# Altium PCB PCB1.pcbdoc (part 1 of 2)
Units mil, origin at the board's own origin, x right, y up, seen from the top; angles counter-clockwise.
Board outline 3937.01 x 2559.06 mil, 2 copper layers (Top Layer, Bottom Layer), stack 62.206 mil thick; 130 components, 96 nets, 456 pads, 345 vias.
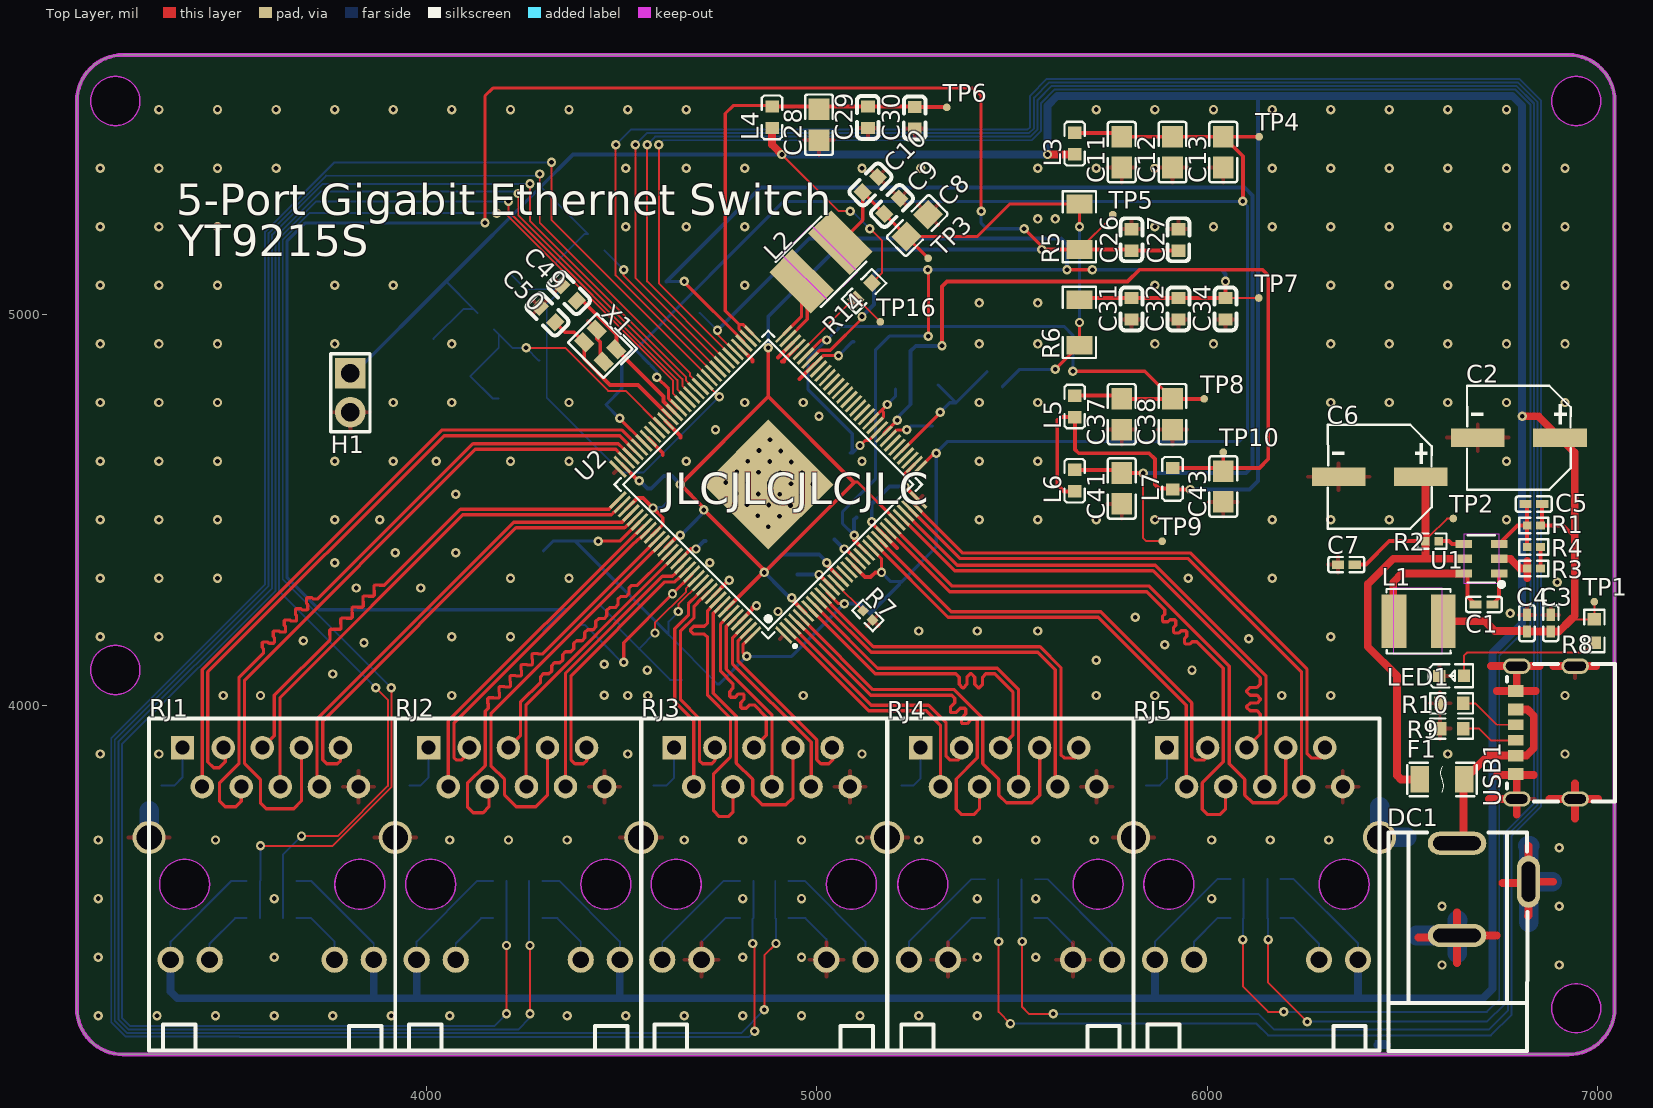
[diagram p0: Top Layer view]
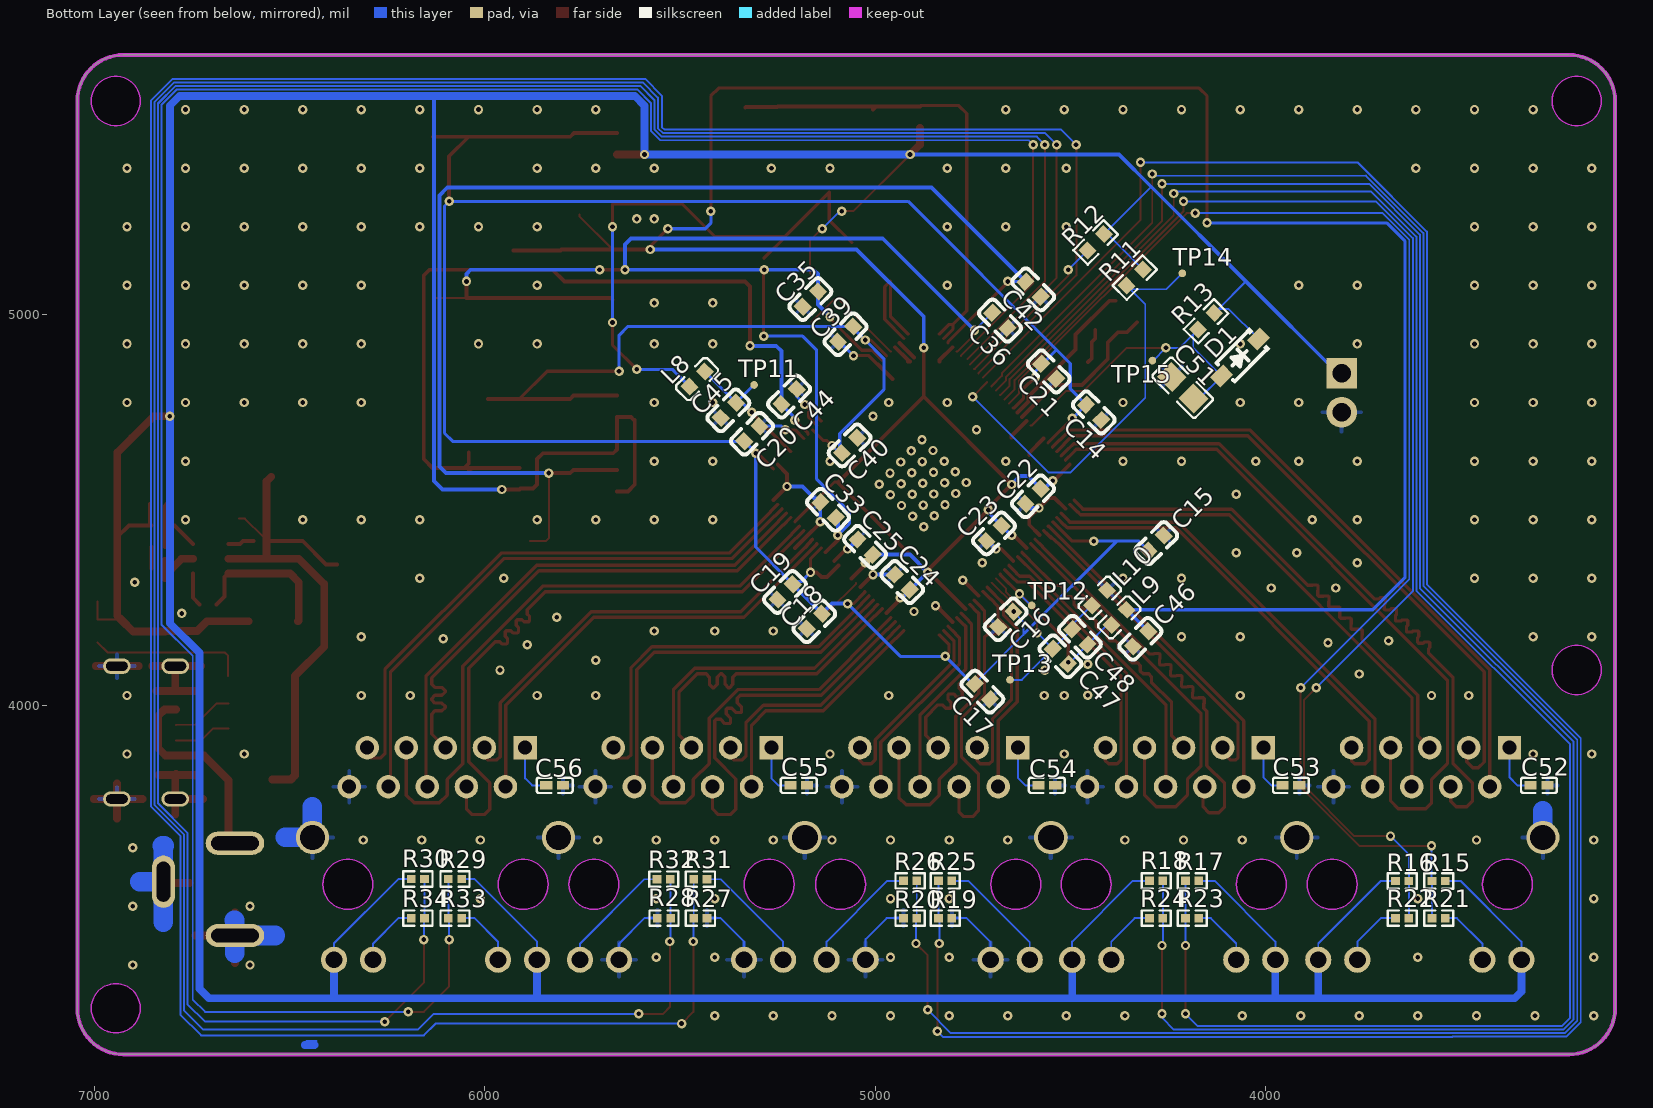
[diagram p1: Bottom Layer view, seen from below]

## Layer stack, top to bottom
Top Solder Mask Layer: solder mask 0.394, Dk 3.3
Top Layer: signal copper 1.379
Dielectric1: surface 59.449, FR4, Dk 4.5
Bottom Layer: signal copper 1.378
Bottom Solder Mask Layer: solder mask 0.394, Dk 3.3

## Board outline
3223.87,5665 ccw(c3223.87,5546.89) 3105.76,5546.89 3105.76,3224.06 ccw(c3223.87,3224.06) 3223.87,3105.94 6924.66,3105.94 ccw(c6924.66,3224.06) 7042.77,3224.06 7042.77,5546.89 ccw(c6924.66,5546.89) 6924.66,5665
cut-out: 3267.18,5546.89 cw(c3204.18,5546.89) 3141.19,5546.89 cw(c3204.18,5546.89)
cut-out: 7007.33,5546.89 cw(c6944.34,5546.89) 6881.35,5546.89 cw(c6944.34,5546.89)
cut-out: 7007.33,3224.06 cw(c6944.34,3224.06) 6881.35,3224.06 cw(c6944.34,3224.06)
cut-out: 3267.18,4090.2 cw(c3204.18,4090.2) 3141.19,4090.2 cw(c3204.18,4090.2)

## Design rules (kind name [scope] priority, off if disabled: settings)
BoardOutlineClearance copperThickness2oz_1 [All] p2 off: genericclearance=8 ignorepadtopadclearanceinfootprint=FALSE except(0: Arc-SplitContinuation Track-SplitContinuation SMDPad-SplitContinuation THPad-SplitContinuation Via-SplitContinuation Fill-SplitContinuation Region-SplitContinuation Poly-SplitContinuation Text-SplitContinuation Hole-SplitContinuation; 6: SMDPad-CutoutEdge THPad-CutoutEdge Via-CutoutEdge Fill-CutoutEdge Region-CutoutEdge Text-CutoutEdge Hole-CutoutEdge; 8: Poly-OutlineEdge Poly-CutoutEdge; 11.8: Arc-OutlineEdge Track-OutlineEdge SMDPad-OutlineEdge THPad-OutlineEdge Via-OutlineEdge Fill-OutlineEdge Region-OutlineEdge Text-OutlineEdge Hole-OutlineEdge Arc-CutoutEdge Track-CutoutEdge)
BoardOutlineClearance Plane_innerPlane_1 [All] p4 off: genericclearance=4 ignorepadtopadclearanceinfootprint=FALSE except(0: Arc-SplitContinuation Track-SplitContinuation SMDPad-SplitContinuation THPad-SplitContinuation Via-SplitContinuation Fill-SplitContinuation Region-SplitContinuation Poly-SplitContinuation Text-SplitContinuation Hole-SplitContinuation; 6: SMDPad-CutoutEdge THPad-CutoutEdge Via-CutoutEdge Fill-CutoutEdge Region-CutoutEdge Text-CutoutEdge Hole-CutoutEdge; 10: Poly-OutlineEdge Poly-CutoutEdge; 11.8: Arc-OutlineEdge Track-OutlineEdge SMDPad-OutlineEdge THPad-OutlineEdge Via-OutlineEdge Fill-OutlineEdge Region-OutlineEdge Text-OutlineEdge Hole-OutlineEdge Arc-CutoutEdge Track-CutoutEdge)
BoardOutlineClearance Copper_copperRegion_1 [All] p6 off: genericclearance=4 ignorepadtopadclearanceinfootprint=FALSE except(0: Arc-SplitContinuation Track-SplitContinuation SMDPad-SplitContinuation THPad-SplitContinuation Via-SplitContinuation Fill-SplitContinuation Region-SplitContinuation Poly-SplitContinuation Text-SplitContinuation Hole-SplitContinuation; 6: SMDPad-CutoutEdge THPad-CutoutEdge Via-CutoutEdge Fill-CutoutEdge Region-CutoutEdge Text-CutoutEdge Hole-CutoutEdge; 10: Poly-OutlineEdge Poly-CutoutEdge; 11.8: Arc-OutlineEdge Track-OutlineEdge SMDPad-OutlineEdge THPad-OutlineEdge Via-OutlineEdge Fill-OutlineEdge Region-OutlineEdge Text-OutlineEdge Hole-OutlineEdge Arc-CutoutEdge Track-CutoutEdge)
BoardOutlineClearance copperThickness1oz_1 [All] p8: genericclearance=4 ignorepadtopadclearanceinfootprint=FALSE except(0: Arc-SplitContinuation Track-SplitContinuation SMDPad-SplitContinuation THPad-SplitContinuation Via-SplitContinuation Fill-SplitContinuation Region-SplitContinuation Poly-SplitContinuation Text-SplitContinuation Hole-SplitContinuation; 6: SMDPad-CutoutEdge THPad-CutoutEdge Via-CutoutEdge Fill-CutoutEdge Region-CutoutEdge Text-CutoutEdge Hole-CutoutEdge; 8: Poly-OutlineEdge Poly-CutoutEdge; 11.8: Arc-OutlineEdge Track-OutlineEdge SMDPad-OutlineEdge THPad-OutlineEdge Via-OutlineEdge Fill-OutlineEdge Region-OutlineEdge Text-OutlineEdge Hole-OutlineEdge Arc-CutoutEdge Track-CutoutEdge)
Clearance copperThickness2oz [All] p1 off: gap=8 ignorepadtopadclearanceinfootprint=FALSE except(6: SMDPad-Track SMDPad-SMDPad THPad-Track SMDPad-THPad THPad-THPad Track-Via SMDPad-Via THPad-Via Via-Via Fill-Track Region-Track Fill-SMDPad Region-SMDPad Fill-THPad Region-THPad Fill-Via Region-Via Fill-Fill Fill-Region Region-Region Arc-Track Arc-SMDPad Arc-THPad Arc-Via Fill-Arc Region-Arc Arc-Arc Text-Track SMDPad-Text Text-THPad Text-Via Fill-Text Region-Text Arc-Text Text-Text Hole-Track Hole-SMDPad Hole-THPad Hole-Via Fill-Hole Region-Hole Hole-Arc Hole-Text)
Clearance Plane_innerPlane [All] p3 off: gap=4 ignorepadtopadclearanceinfootprint=FALSE except(6: SMDPad-Track SMDPad-SMDPad THPad-Track SMDPad-THPad THPad-THPad Track-Via SMDPad-Via THPad-Via Via-Via Fill-Track Region-Track Fill-SMDPad Region-SMDPad Fill-THPad Region-THPad Fill-Via Region-Via Fill-Fill Fill-Region Region-Region Arc-Track Arc-SMDPad Arc-THPad Arc-Via Fill-Arc Region-Arc Arc-Arc Text-Track SMDPad-Text Text-THPad Text-Via Fill-Text Region-Text Arc-Text Text-Text Hole-Track Hole-SMDPad Hole-THPad Hole-Via Fill-Hole Region-Hole Hole-Arc Hole-Text; 10: Poly-Track Poly-SMDPad Poly-THPad Poly-Via Poly-Fill Poly-Region Poly-Poly Poly-Arc Poly-Text Poly-Hole)
Clearance Copper_copperRegion [All] p5 off: gap=4 ignorepadtopadclearanceinfootprint=FALSE except(6: SMDPad-Track SMDPad-SMDPad THPad-Track SMDPad-THPad THPad-THPad Track-Via SMDPad-Via THPad-Via Via-Via Fill-Track Region-Track Fill-SMDPad Region-SMDPad Fill-THPad Region-THPad Fill-Via Region-Via Fill-Fill Fill-Region Region-Region Arc-Track Arc-SMDPad Arc-THPad Arc-Via Fill-Arc Region-Arc Arc-Arc Text-Track SMDPad-Text Text-THPad Text-Via Fill-Text Region-Text Arc-Text Text-Text Hole-Track Hole-SMDPad Hole-THPad Hole-Via Fill-Hole Region-Hole Hole-Arc Hole-Text; 8: Poly-Track Poly-SMDPad Poly-THPad Poly-Via Poly-Fill Poly-Region Poly-Poly Poly-Arc Poly-Text Poly-Hole)
Clearance copperThickness1oz [All] p7: gap=4 ignorepadtopadclearanceinfootprint=FALSE except(6: SMDPad-Track SMDPad-SMDPad THPad-Track SMDPad-THPad THPad-THPad Track-Via SMDPad-Via THPad-Via Via-Via Fill-Track Region-Track Fill-SMDPad Region-SMDPad Fill-THPad Region-THPad Fill-Via Region-Via Fill-Fill Fill-Region Region-Region Arc-Track Arc-SMDPad Arc-THPad Arc-Via Fill-Arc Region-Arc Arc-Arc Text-Track SMDPad-Text Text-THPad Text-Via Fill-Text Region-Text Arc-Text Text-Text Hole-Track Hole-SMDPad Hole-THPad Hole-Via Fill-Hole Region-Hole Hole-Arc Hole-Text; 8: Poly-Track Poly-SMDPad Poly-THPad Poly-Via Poly-Fill Poly-Region Poly-Poly Poly-Arc Poly-Text Poly-Hole)
DiffPairsRouting 100欧姆共面差分阻抗匹配 [(InNet('P3MDIA_P') OR InNet('P3MDIA_N') OR InNet('P3MDIB_P') OR InNet('P3MDIB_N') OR InNet('P3MDIC_P') OR InNet('P3MDIC_N') OR InNet('P3MDID_P') OR InNet('P3MDID_N') OR InNet('P4MDIA_P') OR InNet('P4MDIA_N') OR InNet('P4MDIB_P') OR InNet('P4MDIB_N') OR InNet('P4MDIC_P') OR InNet('P4MDIC_N') OR InNet('P4MDID_P') OR InNet('P4MDID_N') OR InNet('P0MDIA_P') OR InNet('P0MDIA_N') OR InNet('P0MDIB_P') OR InNet('P0MDIB_N') OR InNet('P0MDIC_P') OR InNet('P0MDIC_N') OR InNet('P0MDID_P') OR InNet('P0MDID_N') OR InNet('P1MDIA_P') OR InNet('P1MDIA_N') OR InNet('P1MDIB_P') OR InNet('P1MDIB_N') OR InNet('P1MDIC_P') OR InNet('P1MDIC_N') OR InNet('P1MDID_P') OR InNet('P1MDID_N') OR InNet('P2MDIA_P') OR InNet('P2MDIA_N') OR InNet('P2MDIB_P') OR InNet('P2MDIB_N') OR InNet('P2MDIC_P') OR InNet('P2MDIC_N') OR InNet('P2MDID_P') OR InNet('P2MDID_N'))] p1: maxlimit=6 minlimit=6 mostfreqgap=6 toplayer_minwidth=5 toplayer_prefwidth=8.4 toplayer_maxwidth=100 toplayer_mingap=6 toplayer_prefgap=6 toplayer_maxgap=6 bottomlayer_minwidth=5 bottomlayer_prefwidth=8.4 bottomlayer_maxwidth=100 bottomlayer_mingap=6 bottomlayer_prefgap=6 bottomlayer_maxgap=6 maxuncoupledlength=5
DiffPairsRouting differentialPair [All] p2: maxlimit=6 minlimit=6 mostfreqgap=6 toplayer_minwidth=5 toplayer_prefwidth=10 toplayer_maxwidth=100 toplayer_mingap=6 toplayer_prefgap=6 toplayer_maxgap=6 bottomlayer_minwidth=5 bottomlayer_prefwidth=10 bottomlayer_maxwidth=100 bottomlayer_mingap=6 bottomlayer_prefgap=6 bottomlayer_maxgap=6 maxuncoupledlength=10
HoleToHoleClearance otherClearance [All] p1: gap=11.8 allowstackedmicrovias=TRUE
Length netLength [All] p1: minlimit=0 maxlimit=0
PasteMaskExpansion pasteMaskExpansion [All] p1: expansion=0
PlaneConnect innerPlane [All] p1: planeconnectstyle=Relief reliefexpansion=20 reliefentries=4 reliefconductorwidth=10 reliefairgap=10
PolygonConnect copperRegion [All] p1: connectstyle=Relief reliefconductorwidth=10 reliefentries=4 polygonreliefangle="90 Angle" airgapwidth=10 via.connectstyle=Relief via.reliefconductorwidth=10 via.reliefentries=4 via.polygonreliefangle="90 Angle" via.airgapwidth=10
RoutingVias viaSize [All] p1: holewidth=12 width=24 viastyle="Through Hole" minholewidth=11.8 minwidth=19.7 maxholewidth=248 maxwidth=393.7
SolderMaskExpansion solderMaskExpansion [IsVia] p1: expansion=-1000 istentingtop=TRUE
SolderMaskExpansion solderMaskExpansion [All] p2: expansion=2 istentingtop=FALSE
Width copperThickness2oz_2 [All] p1 off: maxlimit=100 minlimit=8 preferedwidth=10
Width copperThickness1oz_2 [All] p2: maxlimit=100 minlimit=5 preferedwidth=10

## Components (designator, comment, footprint, x,y, rotation, side; value= is the part's Value field where it differs from the comment)
C1 "22nF" C0402 6708.1,4257.91 r180 top
C2 "220uF" CAP-SMD_BD6.3-L6.6-W6.6-LS7.4-FD 6797.46,4685 r180 top
C3 "100nF" C0402 6879.19,4210 r270 top
C4 "10nF" C0402 6818.21,4210 r270 top
C5 "22pF" C0402 6835.76,4515 r180 top
C6 "220uF" CAP-SMD_BD6.3-L6.6-W6.6-LS7.4-FD 6441.28,4585 r180 top
C7 "100nF" C0402 6355.76,4360 r0 top
C8 "10uF" C0805 5257.23,5228.1 r225 top
C9 "10nF" C0603 5192.23,5278.1 r225 top
C10 "100nF" C0603 5137.23,5333.1 r225 top
C11 "10uF" C0805 5780.76,5416.08 r90 top
C12 "10uF" C0805 5910.76,5416.08 r90 top
C13 "10uF" C0805 6040.76,5416.08 r90 top
C14 "10nF" C0603 4440.76,4750 r45 bottom
C15 "10nF" C0603 4280.76,4415 r315 bottom
C16 "10nF" C0603 4665.76,4220 r135 bottom
C17 "10nF" C0603 4725.76,4035 r45 bottom
C18 "10nF" C0603 5155.76,4215 r135 bottom
C19 "10nF" C0603 5230.76,4290 r135 bottom
C20 "10nF" C0603 5315.76,4695 r315 bottom
C21 "10nF" C0603 4555.76,4855 r45 bottom
C22 "10nF" C0603 4595.76,4535 r135 bottom
C23 "10nF" C0603 4695.76,4440 r135 bottom
C24 "10nF" C0603 4930.76,4315 r225 bottom
C25 "10nF" C0603 5025.76,4405 r225 bottom
C26 "10nF" C0603 5805.76,5191.35 r270 top
C27 "10nF" C0603 5925.76,5191.35 r270 top
C28 "10uF" C0805 5005.76,5486.08 r90 top
C29 "1uF" C0603 5130.76,5505.43 r90 top
C30 "10nF" C0603 5250.76,5504.21 r90 top
C31 "10nF" C0603 5805.97,5015 r90 top
C32 "10nF" C0603 5925.97,5015 r90 top
C33 "10nF" C0603 5120.76,4500 r225 bottom
C34 "10nF" C0603 6046.38,5015 r90 top
C35 "10nF" C0603 5165.76,5040 r135 bottom
C36 "10nF" C0603 4680.76,4985 r45 bottom
C37 "10uF" C0805 5780.76,4745 r90 top
C38 "10uF" C0805 5910.76,4745 r90 top
C39 "10nF" C0603 5075.76,4950 r135 bottom
C40 "10nF" C0603 5065.76,4665 r315 bottom
C41 "10uF" C0805 5780.76,4555 r90 top
C42 "10nF" C0603 4595.76,5065 r45 bottom
C43 "10uF" C0805 6040.76,4560 r90 top
C44 "10nF" C0603 5220.76,4790 r315 bottom
C45 "10nF" C0603 5375.76,4755 r135 bottom
C46 "100nF" C0603 4320.76,4170 r135 bottom
C47 "1uF" C0603 4525.76,4125 r225 bottom
C48 "1nF" C0603 4475.76,4175 r225 bottom
C49 "4pF" C0603 4365.76,5055 r315 top
C50 "4pF" C0603 4310.76,5000 r315 top
C51 "10uF" C0805 4213,4812.87 r225 bottom
C52 "100nF" C0402 3300.76,3795 r0 bottom
C53 "100nF" C0402 3935.76,3795 r0 bottom
C54 "100nF" C0402 4560.76,3795 r0 bottom
C55 "100nF" C0402 5195.76,3795 r0 bottom
C56 "100nF" C0402 5820.76,3795 r0 bottom
D1 "1N4148WQ" SOD-123_L2.7-W1.6-LS3.7-RD-1 4065.76,4890 r315 bottom
DC1 "DC-005-20A" DC-IN-TH_DC-005-20A 6730.76,3528.6 r90 top
F1 "BSMD1206-075-30V" F1206 6600.76,3810 r180 top
H1 "PZ254V-11-02P" HDR-TH_2P-P2.54-V-M 3805.76,4800 r270 top
L1 "4.7uH" IND-SMD_L4.0-W4.0 6540.74,4215 r0 top
L2 "2.2uH" IND-SMD_L4.0-W4.0_SWPA4018S 5010.76,5135 r225 top
L3 "BLM18KG221SN1D" L0603 5660.76,5437.85 r90 top
L4 "BLM18KG221SN1D" L0603 4885.76,5505.39 r90 top
L5 "BLM18KG221SN1D" L0603 5660.76,4765 r90 top
L6 "BLM18KG221SN1D" L0603 5660.76,4575 r90 top
L7 "BLM18KG221SN1D" L0603 5911.12,4580 r90 top
L8 "BLM18KG221SN1D" L0603 5455.76,4835 r135 bottom
L9 "BLM18KG221SN1D" L0603 4375.76,4225 r315 bottom
L10 "BLM18KG221SN1D" L0603 4425.76,4275 r315 bottom
LED1 "NCD0603W1" LED0603-RD 6625.38,4075 r0 top
R1 "18kΩ" R0402 6835.76,4460 r180 top
R2 "10kΩ" R0402 6575.12,4420 r0 top
R3 "2kΩ" R0402 6835.76,4350 r180 top
R4 "2kΩ" R0402 6835.76,4405 r0 top
R5 "0Ω" R1206 5672.58,5225 r270 top
R6 "0Ω" R1206 5672.58,4980 r90 top
R7 "2.49kΩ" R0402 5130.76,4230 r135 top
R8 "150Ω" R0603 6990.76,4190 r270 top
R9 "5.1kΩ" R0603 6625.55,3940 r180 top
R10 "5.1kΩ" R0603 6625.55,4005 r0 top
R11 "4.7kΩ" R0603 4335.76,5095 r135 bottom
R12 "4.7kΩ" R0603 4435.76,5185 r135 bottom
R13 "4.7kΩ" R0603 4153,4982.87 r135 bottom
R14 "4.7kΩ" R0603 5120.76,5060 r45 top
R15 "4.7kΩ" R0402 3557.56,3550 r180 bottom
R16 "4.7kΩ" R0402 3650.76,3550 r0 bottom
R17 "4.7kΩ" R0402 4188.48,3550.52 r180 bottom
R18 "4.7kΩ" R0402 4280.76,3550.52 r0 bottom
R19 "4.7kΩ" R0402 4820.76,3455 r180 bottom
R20 "4.7kΩ" R0402 4910.76,3455 r0 bottom
R21 "470Ω" R0402 3557.56,3455 r180 bottom
R22 "470Ω" R0402 3650.76,3455 r180 bottom
R23 "470Ω" R0402 4188.48,3455 r180 bottom
R24 "470Ω" R0402 4280.76,3455 r180 bottom
R25 "470Ω" R0402 4820.76,3550.52 r180 bottom
R26 "470Ω" R0402 4910.76,3550.52 r180 bottom
R27 "4.7kΩ" R0402 5447.56,3455 r180 bottom
R28 "4.7kΩ" R0402 5540.76,3455 r0 bottom
R29 "4.7kΩ" R0402 6075.76,3555 r180 bottom
R30 "4.7kΩ" R0402 6170.76,3555 r0 bottom
R31 "470Ω" R0402 5447.56,3554.51 r180 bottom
R32 "470Ω" R0402 5541.46,3554.51 r180 bottom
R33 "470Ω" R0402 6075.76,3455 r180 bottom
R34 "470Ω" R0402 6170.76,3455 r180 bottom
RJ1 "HR911130A" RJ45-TH_HR911130A 3605.76,3620 r180 top
RJ2 "HR911130A" RJ45-TH_HR911130A 4235.76,3620 r180 top
RJ3 "HR911130A" RJ45-TH_HR911130A 4864.41,3620 r180 top
RJ4 "HR911130A" RJ45-TH_HR911130A 5495.76,3620 r180 top
RJ5 "HR911130A" RJ45-TH_HR911130A 6125.76,3620 r180 top
TP1 "" Test-Point-0.5mm 6990.76,4265 r0 top
TP2 "" Test-Point-0.5mm 6629.49,4478.02 r0 top
TP3 "" Test-Point-0.5mm 5285.07,5144.26 r0 top
TP4 "" Test-Point-0.5mm 6132.64,5455.45 r0 top
TP5 "" Test-Point-0.5mm 5757.65,5255.94 r0 top
TP6 "" Test-Point-0.5mm 5332.74,5530.59 r0 top
TP7 "" Test-Point-0.5mm 6131.51,5042.56 r0 top
TP8 "" Test-Point-0.5mm 5991.82,4784.37 r0 top
TP9 "" Test-Point-0.5mm 5884.27,4419.96 r0 top
TP10 "" Test-Point-0.5mm 6040.76,4647.56 r0 top
TP11 "" test-point-0.5mm 5310.09,4819.96 r180 bottom
TP12 "" Test-Point-0.5mm 4599.41,4255.52 r180 bottom
TP13 "" Test-Point-0.5mm 4654.94,4065 r180 bottom
TP14 "" Test-Point-0.5mm 4213.73,5105.71 r180 bottom
TP15 "" Test-Point-0.5mm 4290.4,4882.36 r225 bottom
TP16 "" Test-Point-0.5mm 5162.72,4981.53 r0 top
U1 "MT2492" SOT-23-6_L2.9-W1.6-P0.95-LS2.8-BL 6701.57,4375 r90 top
U2 "RTL8367S-CG" LQFP-128_L14.0-W14.0-P0.40-LS16.0-BL 4875.76,4565 r45 top
USB1 "TYPE-C 6P(040新)" USB-C-SMD_TYPE-C-6P 6865.76,3930 r90 top
X1 "-" CRYSTAL-SMD_4P-L2.0-W1.6-BL 4445.76,4920 r135 top

## Footprints (in the part's own frame and the unit in brackets; to place one, negate y for a bottom-side part, rotate by r counter-clockwise, add the part's x,y. Pads: shape width x height; smd on the part's side, far side on the other; paste and mask are expansions set on the pad)
C0402 [mm]
  rect 0.79x0.54 smd paste-100 mask+0.051: 1(-0.545,0) 2(0.545,0)
  silkscreen extent -1.17,-0.5 1.17,0.5
C0603 [mm]
  rect 0.8x0.9 smd: 1(-0.7,0) 2(0.7,0)
  silkscreen extent -1.41,-0.71 1.39,0.72
C0805 [mm]
  rect 1.41x1.35 smd paste-100 mask+0.051: 1(-1,0) 2(1,0)
  silkscreen extent -1.96,-0.9 1.96,0.9
CAP-SMD_BD6.3-L6.6-W6.6-LS7.4-FD [mm]
  rect 3.5x1.2 smd: 1(-2.67,0) 2(2.67,0)
  silkscreen extent -3.38,-3.38 3.38,3.38
CRYSTAL-SMD_4P-L2.0-W1.6-BL [mm]
  rect 1.1x0.8 smd: 1(-0.9,-0.575) 2(0.9,-0.575) 3(0.9,0.575) 4(-0.9,0.575)
  silkscreen extent -1.82,-1.56 1.64,1.33
DC-IN-TH_DC-005-20A [mm]
  oval 1.5x3.8 hole 0.9 slot 3.1 at 90 deg copper offset -0.001,0: 1(3.001,2.325)
  oval 1.5x3.8 hole 0.9 slot 3.1 at 90 deg copper offset 0,0: 2(-3.001,2.325)
  oval 3.4x1.5 hole 0.9 slot 2.6 at 0 deg copper offset -0.001,0: 3(0.501,-2.325)
  silkscreen extent -10.51,-2.24 3.71,6.78
F1206 [mm]
  rect 1.19x1.728 smd: 1(-1.445,0) 2(1.445,0)
  silkscreen extent -2.27,-1.09 2.27,1.09
HDR-TH_2P-P2.54-V-M [mm]
  rect 2x2 hole 1.2: 1(-1.27,0)
  round 2 hole 1.2: 2(1.27,0)
  silkscreen extent -2.54,-1.27 2.54,1.27
IND-SMD_L4.0-W4.0 [mm]
  rect 1.6x3.5 smd: 1(-1.6,0) 2(1.6,0)
  silkscreen extent -2.08,-2.1 2.08,2.1
IND-SMD_L4.0-W4.0_SWPA4018S [mil]
  rect 83.62x150.39 smd: 1(70,0) 2(-70,0)
  silkscreen extent -82,-82 82,82
L0603 [mm]
  rect 0.8x0.864 smd paste-100 mask+0.051: 1(-0.7,0) 2(0.7,0)
  silkscreen extent -1.42,-0.65 1.41,0.67
LED0603-RD [mm]
  rect 0.8x0.8 smd: 1(-0.799,-0.003) 2(0.799,0.003)
  silkscreen extent -1.49,-0.75 1.39,0.76
LQFP-128_L14.0-W14.0-P0.40-LS16.0-BL [mm]
  rect 0.2x1.46 smd: 1(-6.2,-7.63) 2(-5.8,-7.63) 3(-5.4,-7.63) 4(-5,-7.63) 5(-4.6,-7.63) 6(-4.2,-7.63) 7(-3.8,-7.63) 8(-3.4,-7.63) 9(-3,-7.63) 10(-2.6,-7.63) 11(-2.2,-7.63) 12(-1.8,-7.63) 13(-1.4,-7.63) 14(-1,-7.63) 15(-0.6,-7.63) 16(-0.2,-7.63) 17(0.2,-7.63) 18(0.6,-7.63) 19(1,-7.63) 20(1.4,-7.63) 21(1.8,-7.63) 22(2.2,-7.63) 23(2.6,-7.63) 24(3,-7.63) 25(3.4,-7.63) 26(3.8,-7.63) 27(4.2,-7.63) 28(4.6,-7.63) 29(5,-7.63) 30(5.4,-7.63) 31(5.8,-7.63) 32(6.2,-7.63) 65(6.2,7.63) 66(5.8,7.63) 67(5.4,7.63) 68(5,7.63) 69(4.6,7.63) 70(4.2,7.63) 71(3.8,7.63) 72(3.4,7.63) 73(3,7.63) 74(2.6,7.63) 75(2.2,7.63) 76(1.8,7.63) 77(1.4,7.63) 78(1,7.63) 79(0.6,7.63) 80(0.2,7.63) 81(-0.2,7.63) 82(-0.6,7.63) 83(-1,7.63) 84(-1.4,7.63) 85(-1.8,7.63) 86(-2.2,7.63) 87(-2.6,7.63) 88(-3,7.63) 89(-3.4,7.63) 90(-3.8,7.63) 91(-4.2,7.63) 92(-4.6,7.63) 93(-5,7.63) 94(-5.4,7.63) 95(-5.8,7.63) 96(-6.2,7.63)
  rect 1.46x0.2 smd: 33(7.63,-6.2) 34(7.63,-5.8) 35(7.63,-5.4) 36(7.63,-5) 37(7.63,-4.6) 38(7.63,-4.2) 39(7.63,-3.8) 40(7.63,-3.4) 41(7.63,-3) 42(7.63,-2.6) 43(7.63,-2.2) 44(7.63,-1.8) 45(7.63,-1.4) 46(7.63,-1) 47(7.63,-0.6) 48(7.63,-0.2) 49(7.63,0.2) 50(7.63,0.6) 51(7.63,1) 52(7.63,1.4) 53(7.63,1.8) 54(7.63,2.2) 55(7.63,2.6) 56(7.63,3) 57(7.63,3.4) 58(7.63,3.8) 59(7.63,4.2) 60(7.63,4.6) 61(7.63,5) 62(7.63,5.4) 63(7.63,5.8) 64(7.63,6.2) 97(-7.63,6.2) 98(-7.63,5.8) 99(-7.63,5.4) 100(-7.63,5) 101(-7.63,4.6) 102(-7.63,4.2) 103(-7.63,3.8) 104(-7.63,3.4) 105(-7.63,3) 106(-7.63,2.6) 107(-7.63,2.2) 108(-7.63,1.8) 109(-7.63,1.4) 110(-7.63,1) 111(-7.63,0.6) 112(-7.63,0.2) 113(-7.63,-0.2) 114(-7.63,-0.6) 115(-7.63,-1) 116(-7.63,-1.4) 117(-7.63,-1.8) 118(-7.63,-2.2) 119(-7.63,-2.6) 120(-7.63,-3) 121(-7.63,-3.4) 122(-7.63,-3.8) 123(-7.63,-4.2) 124(-7.63,-4.6) 125(-7.63,-5) 126(-7.63,-5.4) 127(-7.63,-5.8) 128(-7.63,-6.2)
  silkscreen extent -7.08,-8.76 7.08,7.08
R0402 [mm]
  rect 0.566x0.54 smd paste-100 mask+0.051: 1(-0.433,0) 2(0.433,0)
  silkscreen extent -0.94,-0.5 0.94,0.5
R0603 [mil]
  rect 31.75x34.02 smd paste-3937.01 mask+2: 1(-29.66,0) 2(29.66,0)
  silkscreen extent -55,-26 55,26
R1206 [mil]
  rect 47.54x66.97 smd paste-3937.01 mask+2: 1(-58.22,0) 2(58.22,0)
  silkscreen extent -91,-42 91,42
RJ45-TH_HR911130A [mil]
  round 66.93 hole 43.31: 11(260,271.58) 12(160,271.58) 13(-160,271.58) 14(-260,271.58)
  rect 60x60 hole 35.83: P1(229.63,-271.58)
  round 60 hole 35.83: P2(179.1,-171.34) P3(125.2,-271.34) P4(79.1,-171.34) P5(25.2,-271.34) P6(-20.9,-171.34) P7(-74.8,-271.34) P8(-120.9,-171.34) P9(-174.8,-271.34) P10(-220.9,-171.34)
  round 85 hole 65: SHIELD0(-315,-41.44) SHIELD1(315,-41.44)
  Board Outline Layer circle w0.1: c-224.4,78.66 r63.98
  Board Outline Layer circle w0.1: c224.4,78.66 r63.98
  Board Outline Layer region: -288.38,78.66 -282.04,106.42 -264.29,128.68 -238.64,141.04 -210.16,141.04 -184.51,128.68 -166.76,106.42 -160.42,78.66 -160.42,78.66 -166.76,50.91 -184.51,28.65 -210.16,16.29 -238.64,16.29 -264.29,28.65 -282.04,50.91 -288.38,78.66
  Board Outline Layer region: -288.38,78.66 -288,85.58 -286.88,92.42 -285.03,99.09 -282.46,105.53 -279.22,111.65 -275.33,117.38 -270.85,122.66 -265.82,127.42 -260.3,131.62 -254.37,135.19 -248.08,138.1 -241.52,140.31 -234.75,141.8 -227.86,142.55 -220.94,142.55 -214.05,141.8 -207.28,140.31 -200.72,138.1 -194.43,135.19 -188.5,131.62 -182.98,127.42 -177.95,122.66 -173.47,117.38 -169.58,111.65 -166.34,105.53 -163.77,99.09 -161.92,92.42 -160.8,85.58 -160.42,78.66 -160.8,71.75 -161.92,64.91 -163.77,58.24 -166.34,51.8 -169.58,45.68 -173.47,39.95 -177.95,34.67 -182.98,29.9 -188.5,25.71 -194.43,22.14 -200.72,19.23 -207.28,17.02 -214.05,15.53 -220.94,14.78 -227.86,14.78 -234.75,15.53 -241.52,17.02 -248.08,19.23 -254.37,22.14 -260.3,25.71 -265.82,29.9 -270.85,34.67 -275.33,39.95 -279.22,45.68 -282.46,51.8 -285.03,58.24 -286.88,64.91 -288,71.75
  Board Outline Layer region: 160.42,78.66 166.76,106.42 184.51,128.68 210.16,141.04 238.64,141.04 264.29,128.68 282.04,106.42 288.38,78.66 288.38,78.66 282.04,50.91 264.29,28.65 238.64,16.29 210.16,16.29 184.51,28.65 166.76,50.91 160.42,78.66
  Board Outline Layer region: 160.42,78.66 160.8,85.58 161.92,92.42 163.77,99.09 166.34,105.53 169.58,111.65 173.47,117.38 177.95,122.66 182.98,127.42 188.5,131.62 194.43,135.19 200.72,138.1 207.28,140.31 214.05,141.8 220.94,142.55 227.86,142.55 234.75,141.8 241.52,140.31 248.08,138.1 254.37,135.19 260.3,131.62 265.82,127.42 270.85,122.66 275.33,117.38 279.22,111.65 282.46,105.53 285.03,99.09 286.88,92.42 288,85.58 288.38,78.66 288,71.75 286.88,64.91 285.03,58.24 282.46,51.8 279.22,45.68 275.33,39.95 270.85,34.67 265.82,29.9 260.3,25.71 254.37,22.14 248.08,19.23 241.52,17.02 234.75,15.53 227.86,14.78 220.94,14.78 214.05,15.53 207.28,17.02 200.72,19.23 194.43,22.14 188.5,25.71 182.98,29.9 177.95,34.67 173.47,39.95 169.58,45.68 166.34,51.8 163.77,58.24 161.92,64.91 160.8,71.75
  Multi-Layer board cut-out: -288.38,78.66 -282.04,106.42 -264.29,128.68 -238.64,141.04 -210.16,141.04 -184.51,128.68 -166.76,106.42 -160.42,78.66 -160.42,78.66 -166.76,50.91 -184.51,28.65 -210.16,16.29 -238.64,16.29 -264.29,28.65 -282.04,50.91 -288.38,78.66
  Multi-Layer board cut-out: 160.42,78.66 166.76,106.42 184.51,128.68 210.16,141.04 238.64,141.04 264.29,128.68 282.04,106.42 288.38,78.66 288.38,78.66 282.04,50.91 264.29,28.65 238.64,16.29 210.16,16.29 184.51,28.65 166.76,50.91 160.42,78.66
  silkscreen extent -315,-346 315,504
SOD-123_L2.7-W1.6-LS3.7-RD-1 [mm]
  rect 1.2x0.95 smd: 1(-1.7,0) 2(1.7,0)
  silkscreen extent -1.81,-0.98 1.35,0.98
SOT-23-6_L2.9-W1.6-P0.95-LS2.8-BL [mil]
  rect 20.95x42.2 smd: 1(-37.4,-45.24) 2(0,-45.24) 3(37.4,-45.24) 4(37.4,45.24) 5(0,45.24) 6(-37.4,45.24)
  silkscreen extent -72,-57 61,35
Test-Point-0.5mm [mm]
  round 0.5 smd: 1(0,0)
test-point-0.5mm [mm]
  round 0.5 smd: 1(0,0)
USB-C-SMD_TYPE-C-6P [mm]
  oval 1x1.8 hole 0.6 slot 1.4 at 90 deg paste+0 mask+0.05: 1(-4.32,-1.925) 1(-4.32,1.875) 2(4.32,-1.925) 2(4.32,1.875)
  rect 0.7x1 smd paste-100 mask+0.05: A5(-0.499,1.925) B5(0.501,1.925)
  rect 0.75x1 smd paste-100 mask+0.05: A9(1.501,1.925) B9(-1.499,1.925)
  rect 0.8x1 smd paste-100 mask+0.05: A12(2.701,1.925) B12(-2.699,1.925)
  silkscreen extent -4.47,-4.52 4.47,2.5

## Free pads (board coordinates)
  rect 236.22x236.22 smd rot 45: 129(4876.24,4565)

## Via types
v1: diameter 24, hole 12, Top Layer to Bottom Layer, 190 vias
v2: diameter 24.02, hole 12, Top Layer to Bottom Layer, 155 vias

## Nets (pads, with @x,y where several pads share a name; then routed paths per layer and width w, separated by ;. In a path a pad name is that pad's centre, name@x,y a point inside that pad or via, vN(x,y) a via of type N, cw(c..) or ccw(c..) an arc to the next point about the centre after c; other vN are vias at no path point)
3V3: C2.1 C3.2 C4.2 C5.1 D1.1 H1.1 L1.2 L3.1 L4.1 L5.1 L6.1 L7.1 R1.1 R8.1 R11.2 R12.2 R13.2 R14.2 R15.2 R16.2 R17.2 R18.2 R29.2 R30.2 RJ1.11 RJ1.14 RJ2.11 RJ2.14 RJ5.11 RJ5.14 TP1.1 | length 15773.8
  Top Layer w5: v2(4910.76,5410) 5055.76,5265 v2(5085.76,5265) ; v2(5135.76,5220) 5136.73,5220 5167.48,5189.25 5167.48,5106.72 R14.2@5141.73,5080.97 ; 6930.94,4219.66 R8.1@6990.76,4219.66 TP1.1@6990.76,4265
  Top Layer w10: L6.1@5660.76,4547.44 5633.31,4547.44 5615.76,4565 5615.76,4730 5618.31,4730 5625.76,4737.44 L5.1@5660.76,4737.44 5660.76,4655 5670.76,4645 5850.76,4645 5865.76,4630 5865.76,4565 5875.76,4555 5908.57,4555 L7.1@5911.12,4552.44 v2(5955.76,4552.44) ; C5.1@6857.22,4515 6857.22,4464.42 R1.1@6852.8,4460 6910.76,4460 6940.76,4430
  Top Layer w20: L4.1@4885.76,5477.84 4885.76,5435 v2(4910.76,5410) ; v2(5590.76,5410) 5660.46,5410 L3.1@5660.76,5410.29 ; L1.2@6603.73,4215 6710.76,4215 6735.76,4190 6816.75,4190 C4.2@6818.21,4188.54 C3.2@6879.19,4188.54 6899.82,4188.54 6930.94,4219.66 6940.76,4229.48 6940.76,4430 6940.76,4646.77 C2.1@6902.57,4685 6847.53,4740 v2(6805.76,4740)
  Bottom Layer w5: RJ1.11@3345.76,3348.42 3345.76,3395.04 3500.72,3550 R15.2@3540.52,3550 ; R16.2@3667.8,3550 3705.76,3550 3865.76,3390 RJ1.14@3865.76,3348.42 ; RJ2.11@3975.76,3348.42 3975.76,3395 4131.28,3550.52 R17.2@4171.44,3550.52 ; D1.1@4018.43,4937.33 4018.43,4937.67 4095.76,5015 R13.2@4120.87,5015 ; 4049.32,5083.56 4052.31,5083.56 R13.2@4120.87,5015 ; R13.2@4132.02,5003.84 R13.2@4120.87,5015 ; 4293.26,5327.5 R12.2@4414.79,5205.97 4404.79,5205.97 R11.2@4314.79,5115.97 ; R18.2@4297.8,3550.52 4340.28,3550.52 4495.76,3395.04 RJ2.14@4495.76,3348.42 ; v2(5085.76,5265) 5090.76,5265 v2(5135.76,5220) ; RJ5.11@5865.76,3348.42 5865.76,3395 6025.76,3555 R29.2@6058.72,3555 ; R30.2@6187.8,3555 6220.76,3555 6385.76,3390 RJ5.14@6385.76,3348.42
  Bottom Layer w10: H1.1@3805.76,4850 3815.76,4850 4049.32,5083.56 4293.26,5327.5 4375.76,5410 v2(4910.76,5410) ; v2(5955.76,4552.44) 6108.2,4552.44 6129.76,4574 6129.76,5560
  Bottom Layer w20: RJ1.11@3345.76,3348.42 3345.76,3266.85 3362.61,3250 3864.83,3250 ; RJ1.14@3865.76,3348.42 3865.76,3250.92 3864.83,3250 ; RJ2.11@3975.76,3348.42 3975.76,3250.88 3974.88,3250 ; RJ2.14@4495.76,3348.42 4495.76,3250.09 4495.85,3250 ; v2(4910.76,5410) v2(5590.76,5410) 5590.76,5535 5615.76,5560 6129.76,5560 6780.76,5560 6805.76,5535 v2(6805.76,4740) 6805.76,4210 6730.03,4134.27 6730.03,3274.27 6705.76,3250 6386.92,3250 ; RJ5.11@5865.76,3348.42 5865.76,3253.48 5869.24,3250 ; RJ5.14@6385.76,3348.42 6385.76,3251.16 6386.92,3250 ; 3864.83,3250 3974.88,3250 ; 3974.88,3250 4495.85,3250 ; 4495.85,3250 5869.24,3250 ; 5869.24,3250 6386.92,3250
$1N2005: R7.2 U2.13 | length 100.4
  Top Layer w5: U2.13@5049.19,4313.62 5049.19,4311.57 R7.2@5118.71,4242.05
$1N2999: L2.1 U2.63 U2.64 | length 327.4
  Top Layer w8: U2.64@4915.57,4950.01 4961.26,4995.7 L2.1@4961.26,5085.5 4975.76,5071.01 4975.76,4987.94 U2.63@4926.7,4938.88
$1N4938: R3.1 R4.2 | length 55
  Top Layer w10: R3.1@6852.8,4350 R4.2@6852.8,4405
$1N4945: C5.2 R1.2 R4.1 U1.3 | length 203.5
  Top Layer w10: U1.3@6746.81,4412.4 6794.41,4460 R1.2@6818.72,4460 ; C5.2@6814.3,4515 6818.72,4510.58 R1.2@6818.72,4460 ; R4.1@6818.72,4405 R1.2@6818.72,4460
$1N4947: R2.2 U1.4 | length 67.3
  Top Layer w10: R2.2@6592.16,4420 6618.22,4420 6625.82,4412.4 U1.4@6656.33,4412.4
$1N4948: C1.1 U1.1 | length 86.8
  Top Layer w10: C1.1@6729.56,4257.91 6746.81,4275.17 U1.1@6746.81,4337.6
$1N4949: C1.2 L1.1 U1.6 | length 383
  Top Layer w10: U1.6@6656.33,4337.6 6665.76,4328.17 6665.76,4278.79 C1.2@6686.64,4257.91
  Top Layer w20: L1.1@6477.75,4215 6475.76,4216.99 6475.76,4315 6498.36,4337.6 U1.6@6656.33,4337.6
$1N9816: R9.1 USB1.A5 | length 147.3
  Top Layer w5: R9.1@6655.21,3940 6695.76,3940 6725.76,3910 6789.61,3910 USB1.A5@6789.97,3910.36
$1N9819: R10.2 USB1.B5 | length 157.7
  Top Layer w5: R10.2@6655.21,4005 6685.76,4005 6740.76,3950 6789.7,3950 USB1.B5@6789.97,3949.73
$1N10186: LED1.2 R8.2 | length 399
  Top Layer w5: LED1.2@6656.86,4075.14 6656.86,4126.1 6665.76,4135 6965.42,4135 R8.2@6990.76,4160.34
$2N645: R21.2 RJ1.12 | length 163.3
  Bottom Layer w5: RJ1.12@3445.76,3348.42 3445.76,3390 3510.76,3455 R21.2@3540.52,3455
$2N647: R22.1 RJ1.13 | length 169.4
  Bottom Layer w5: R22.1@3667.8,3455 3705.76,3455 3765.76,3395 RJ1.13@3765.76,3348.42
$2N653: C52.2 RJ1.P1 | length 138.6
  Bottom Layer w5: C52.2@3322.22,3795 3355.76,3795 3376.13,3815.37 RJ1.P1@3376.13,3891.58
$2N1076: R23.2 RJ2.12 | length 164.2
  Bottom Layer w5: RJ2.12@4075.76,3348.42 4075.76,3390 4140.76,3455 R23.2@4171.44,3455
$2N1078: R24.1 RJ2.13 | length 169.4
  Bottom Layer w5: R24.1@4297.8,3455 4335.76,3455 4395.76,3395 RJ2.13@4395.76,3348.42
$2N1084: C53.2 RJ2.P1 | length 133.6
  Bottom Layer w5: C53.2@3957.22,3795 3985.76,3795 4006.13,3815.37 RJ2.P1@4006.13,3891.58
$2N1523: C54.2 RJ3.P1 | length 137.9
  Bottom Layer w5: C54.2@4582.22,3795 4615.63,3795 4634.78,3814.15 RJ3.P1@4634.78,3891.58
$2N1954: C55.2 RJ4.P1 | length 135
  Bottom Layer w5: C55.2@5217.22,3795 5248.17,3795 5266.13,3812.96 RJ4.P1@5266.13,3891.58
$2N2377: R33.2 RJ5.12 | length 164.4
  Bottom Layer w5: RJ5.12@5965.76,3348.42 5965.76,3395 6025.76,3455 R33.2@6058.72,3455
$2N2379: R34.1 RJ5.13 | length 166.5
  Bottom Layer w5: R34.1@6187.8,3455 6220.76,3455 6285.76,3390 RJ5.13@6285.76,3348.42
$2N2385: C56.2 RJ5.P1 | length 140
  Bottom Layer w5: C56.2@5842.22,3795 5878.3,3795 5896.13,3812.83 RJ5.P1@5896.13,3891.58
$2N6448: R25.2 RJ3.11 | length 309.5
  Bottom Layer w5: RJ3.11@4604.41,3348.42 4604.41,3393.65 4761.28,3550.52 R25.2@4803.72,3550.52
$2N6531: R31.2 RJ4.11 | length 307.4
  Bottom Layer w5: RJ4.11@5235.76,3348.42 5235.76,3395.04 5395.24,3554.51 R31.2@5430.52,3554.51
$2N6555: R26.1 RJ3.14 | length 307.6
  Bottom Layer w5: R26.1@4927.8,3550.52 4968.93,3550.52 5124.41,3395.04 RJ3.14@5124.41,3348.42
$2N6593: R32.1 RJ4.14 | length 307
  Bottom Layer w5: R32.1@5558.5,3554.51 5591.25,3554.51 5755.76,3390 RJ4.14@5755.76,3348.42
AVDDH: C11.2 C12.2 C13.2 C14.2 C15.2 C16.2 C17.2 C18.2 C19.2 C20.2 C21.2 L3.2 TP4.1 U2.11 U2.17 U2.21 U2.33 U2.82 U2.90 U2.102 U2.116 U2.128 | length 6635.6
  Top Layer w5: v2(4645.76,4240) 4645.76,4258.27 4701.11,4313.62 U2.116@4702.33,4313.62
  Top Layer w8: v2(4440.76,4420) 4495.76,4420 4545.27,4469.51 U2.102@4546.43,4469.51 ; v2(4495.76,4735) 4495.76,4733.42 U2.90@4557.56,4671.62 ; v2(4590.76,4840) 4620.76,4810 4620.76,4785 4645.05,4760.71 U2.82@4646.65,4760.71 ; v2(4820.76,4125) 4810.76,4135 4810.76,4154.8 U2.128@4835.95,4179.99 ; U2.11@5026.92,4291.35 5026.92,4288.83 5055.76,4260 v2(5070.76,4260) ; U2.21@5138.28,4402.7 5165.76,4375.23 v2(5165.76,4340) ; U2.33@5260.76,4604.81 5260.76,4605.01 5300.76,4645 v2(5305.76,4645)
  Top Layer w10: U2.17@5093.73,4358.16 5123.77,4328.12 5137.91,4328.12 5149.79,4340 v2(5165.76,4340) ; L3.2@5660.76,5465.4 5770.8,5465.4 C11.2@5780.76,5455.45 C12.2@5910.76,5455.45 C13.2@6040.76,5455.45 ; v2(6090.76,5290) 6090.76,5405.45 C13.2@6040.76,5455.45 ; TP4.1@6132.64,5455.45 C13.2@6040.76,5455.45
  Bottom Layer w5: 4616.88,4185 4616.88,4183.88 4620.76,4180 ; v2(4645.76,4240) C16.2@4646.27,4239.49 4620.76,4213.98 4620.76,4180 ; C17.2@4745.25,4054.49 4745.25,4055.51 4620.76,4180
  Bottom Layer w8: C15.2@4300.25,4395.51 4324.73,4420 4381.88,4420 ; v2(4440.76,4420) 4381.88,4420 ; v2(4495.76,4735) 4494.73,4735 C14.2@4460.25,4769.49 4500.76,4810 4500.76,4875 4535.76,4910 ; C21.2@4571.27,4874.49 4535.76,4910 ; C21.2@4575.25,4870 4590.76,4854.49 v2(4590.76,4840) ; 4616.88,4185 4381.88,4420 ; C17.2@4745.25,4054.49 4750.25,4054.49 v2(4820.76,4125) 4935.76,4125 v2(5070.76,4260) ; v2(5165.76,4340) 5189.3,4316.46 C19.2@5217.22,4316.46 ; C19.2@5211.27,4309.49 5211.27,4310.51 C19.2@5217.22,4316.46 ; 4535.76,4910 4915.76,5290 v2(6090.76,5290) 6102.76,5278 6102.76,4696.61 6081.66,4675.51 C20.2@5335.25,4675.51 5305.76,4646.02 v2(5305.76,4645) 5305.76,4405 C19.2@5217.22,4316.46
  Bottom Layer w10: v2(5070.76,4260) 5110.76,4260 C18.2@5136.27,4234.49 C19.2@5211.27,4309.49
  other v2: 5305.76,4645
AVDDL: C22.2 C23.2 C24.2 C25.2 C26.2 C27.2 C46.2 L9.1 R5.2 TP5.1 U2.6 U2.14 U2.27 U2.95 U2.108 U2.122 | length 8080.2
  Top Layer w5: R5.2@5672.58,5166.78 5757.65,5251.85 TP5.1@5757.65,5255.94
  Top Layer w8: v2(4150.76,5235) 4150.76,5560 4170.76,5580 5400.76,5580 5420.76,5560 v2(5420.76,5265) ; 5094.1,4571.65 5104.1,4571.65 5205.09,4470.67 U2.27@5205.09,4469.51 ; v2(5530.76,5220) 5575.76,5175 v2(5575.76,5166.78)
  Top Layer w10: U2.95@4501.88,4615.94 4542.82,4575 v2(4545.76,4575) ; U2.108@4613.24,4402.7 4641.34,4430.81 4646.57,4430.81 v2(4650.76,4435) ; v2(4710.76,4500) v2@4708.83,4498.07 ; U2.122@4769.14,4246.8 4862.34,4340 v2(4865.76,4340) v2@4865.76,4345 ; v2(4875.76,4915) 4875.76,4790 ; v2(4935.76,4275) 4943.14,4267.62 4943.14,4263.78 U2.6@4971.25,4235.67 ; v2(5025.76,4365) 5025.76,4359.32 U2.14@5060.33,4324.75 ; 5094.1,4571.65 4875.76,4790 ; 5096.55,4570.8 4870.76,4345 v2@4865.76,4345 ; v2(5575.76,5166.78) R5.2@5672.58,5166.78 5802.77,5166.78 C26.2@5805.76,5163.79 C27.2@5925.76,5163.79 ; v2@4708.83,4498.07 4708.83,4506.93 v2(4650.76,4565) 4875.76,4790 ; v2@4708.83,4498.07 4712.69,4498.07 v2@4865.76,4345
  Bottom Layer w8: v2(4150.76,5235) 3690.61,5235 3643.26,5187.65 3643.26,4327.35 3726.12,4244.48 L9.1@4356.27,4244.48 C46.2@4301.27,4189.49 ; v2(5420.76,5265) 5420.76,5234.19 5434.95,5220 v2(5530.76,5220)
  Bottom Layer w10: v2(4545.76,4575) 4566.27,4554.49 C22.2@4576.27,4554.49 4608.16,4586.38 4629.38,4586.38 v2(4650.76,4565) ; v2(4650.76,4435) 4651.78,4435 C23.2@4676.27,4459.49 4710.76,4493.98 v2(4710.76,4500) ; v2(4875.76,4915) 4875.76,4995 5047.54,5166.78 v2(5575.76,5166.78) ; v2(4935.76,4275) 4931.78,4275 C24.2@4911.27,4295.51 4866.78,4340 v2(4865.76,4340) 4911.27,4385.51 C25.2@5006.27,4385.51 5025.76,4366.02 v2(5025.76,4365)
DISAUTOLOAD: R11.1 TP14.1 U2.76 | length 1112.6
  Top Layer w5: U2.76@4713.46,4827.52 4750.76,4790.23 v2(4750.76,4790)
  Bottom Layer w5: TP14.1@4213.73,5105.71 4254.44,5065 R11.1@4347.7,5065 ; R11.1@4356.73,5074.03 R11.1@4347.7,5065 ; v2(4750.76,4790) 4556.27,4595.51 4500.25,4595.51 4308.74,4787.02 4308.74,5026.04 R11.1@4347.7,5065
DVDDIO: C41.2 C42.2 L6.2 TP9.1 U2.67 | length 3252.2
  Top Layer w5: v2(5835.76,4594.37) 5835.76,4427.57 5843.37,4419.96 TP9.1@5884.27,4419.96
  Top Layer w8: v2(4660.76,5085) 4660.76,5083.23 4813.68,4930.3 U2.67@4813.68,4927.74
  Top Layer w10: L6.2@5660.76,4602.56 5772.57,4602.56 C41.2@5780.76,4594.37 v2(5835.76,4594.37)
  Bottom Layer w8: C42.2@4615.25,5084.49 4660.25,5084.49 v2(4660.76,5085)
  Bottom Layer w10: C42.2@4615.25,5084.49 4855.76,5325 6095.76,5325 6115.76,5305 6115.76,4611.43 6098.7,4594.37 v2(5835.76,4594.37)
DVDDIO_2: C37.2 C38.2 C39.2 C40.2 L5.2 TP8.1 U2.42 U2.59 | length 1896.7
  Top Layer w8: U2.59@4971.25,4894.33 5011.92,4935 v2(5025.76,4935) ; v2(5110.76,4665) 5123.68,4677.92 5133.44,4677.92 U2.42@5160.55,4705.03 ; v2(5655.76,4855) 5840.13,4855 C38.2@5910.76,4784.37
  Top Layer w10: L5.2@5660.76,4792.56 5772.57,4792.56 C37.2@5780.76,4784.37 C38.2@5910.76,4784.37 TP8.1@5991.82,4784.37
  Bottom Layer w8: v2(5110.76,4665) 5091.27,4645.51 C40.2@5085.25,4645.51 5090.76,4651.02 5090.76,4695 4977.77,4807.99 4977.77,4887.01 v2(5025.76,4935) 5056.27,4965.51 C39.2@5056.27,4969.49 5633.75,4969.49 5655.76,4947.47 v2(5655.76,4855)
DVDDL: C31.2 C32.2 C33.2 C34.2 C35.2 C36.2 R6.2 TP7.1 U2.20 U2.58 U2.69 | length 3885.6
  Top Layer w5: v2(4745.76,4960) 4745.76,4950 4790.29,4905.46 U2.69@4791.41,4905.46 ; C34.2@6046.38,5042.56 TP7.1@6131.51,5042.56
  Top Layer w8: U2.58@4982.38,4883.2 5007.98,4908.8 5034.56,4908.8 5115.76,4990 v2(5115.76,4995) ; v2(5285.76,4945) v2@5285.76,5115
  Top Layer w10: v2(5095.76,4435) 5095.76,4422.95 U2.20@5127.14,4391.57 ; v2(5283.88,5115) v2@5285.76,5115 ; v2(5640.76,5115) v2(5705.76,5115) ; R6.2@5672.58,5038.22 5676.92,5042.56 C31.2@5805.97,5042.56 C32.2@5925.97,5042.56 C34.2@6046.38,5042.56 v2(6046.38,5085)
  Bottom Layer w5: C36.2@4700.25,5004.49 4744.73,4960 v2(4745.76,4960)
  Bottom Layer w8: v2(5095.76,4435) 5065.76,4465 5065.76,4495 5150.76,4580 5150.76,4910 5185.76,4945 v2(5285.76,4945)
  Bottom Layer w10: v2(4745.76,4960) 4980.76,5195 5625.76,5195 5640.76,5180 v2(5640.76,5115) v2(5283.88,5115) 5157.41,5115 5146.27,5103.87 C35.2@5146.27,5059.49 5146.27,5025.51 v2(5115.76,4995) ; v2(5095.76,4435) 5095.76,4475 C33.2@5101.27,4480.51 ; v2(5705.76,5115) 6035.76,5115 6046.38,5104.38 v2(6046.38,5085)
EN_PWRLIGHT: R12.1 U2.73 | length 424.5
  Top Layer w5: v2(4505.76,5115) 4505.76,5100 4744.84,4860.92 U2.73@4746.87,4860.92
  Bottom Layer w5: R12.1@4456.73,5164.03 v2(4505.76,5115)
EN_SWR: R14.1 TP16.1 U2.60 | length 281.7
  Top Layer w5: U2.60@4960.11,4905.46 5093.67,5039.03 R14.1@5099.79,5039.03 5105.22,5039.03 TP16.1@5162.72,4981.53